# Altium PCB PCB1.pcbdoc
Units mm, origin at the board's own origin, x right, y up, seen from the top; angles counter-clockwise.
Board outline 73.53 x 57.41 mm, 2 copper layers (Top Layer, Bottom Layer); 9 components, 7 nets, 21 pads, 0 vias.
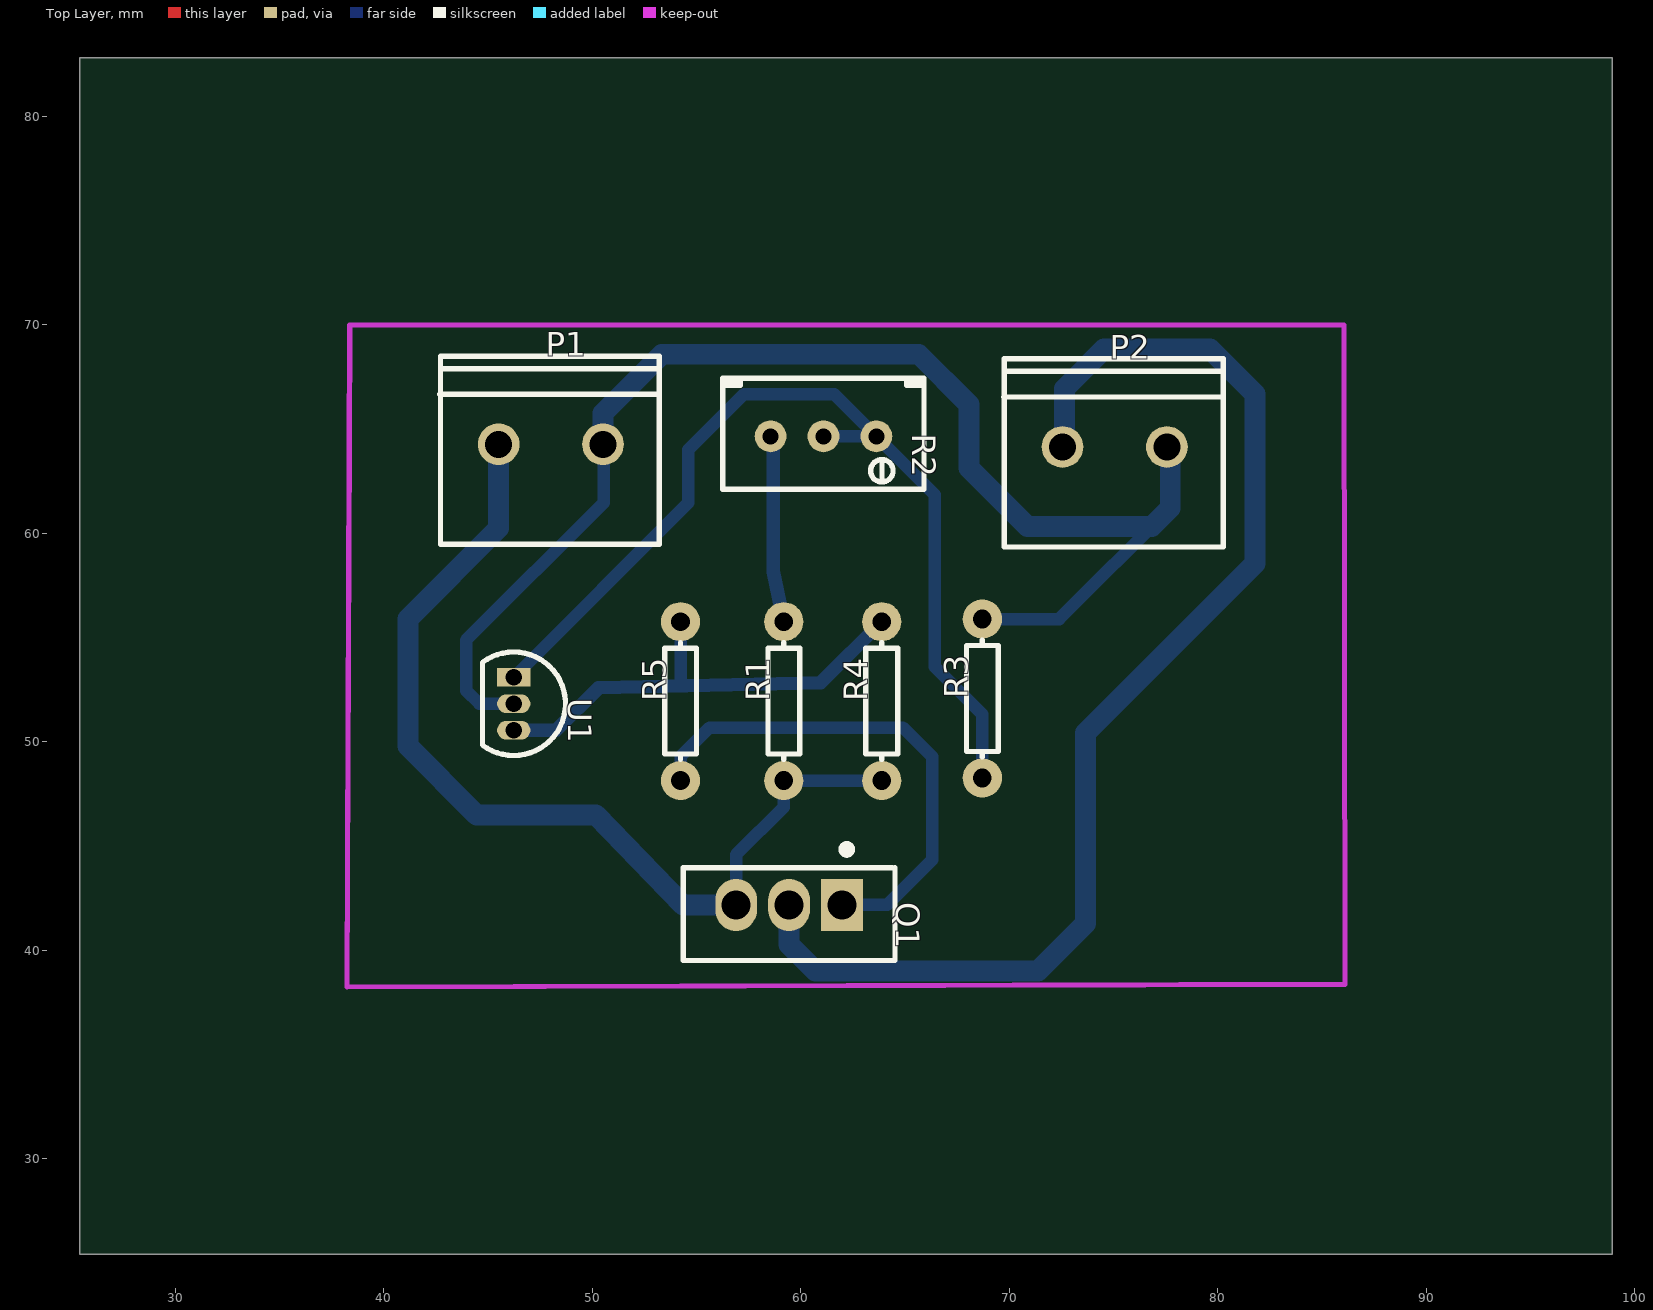
[diagram p0: Top Layer view]
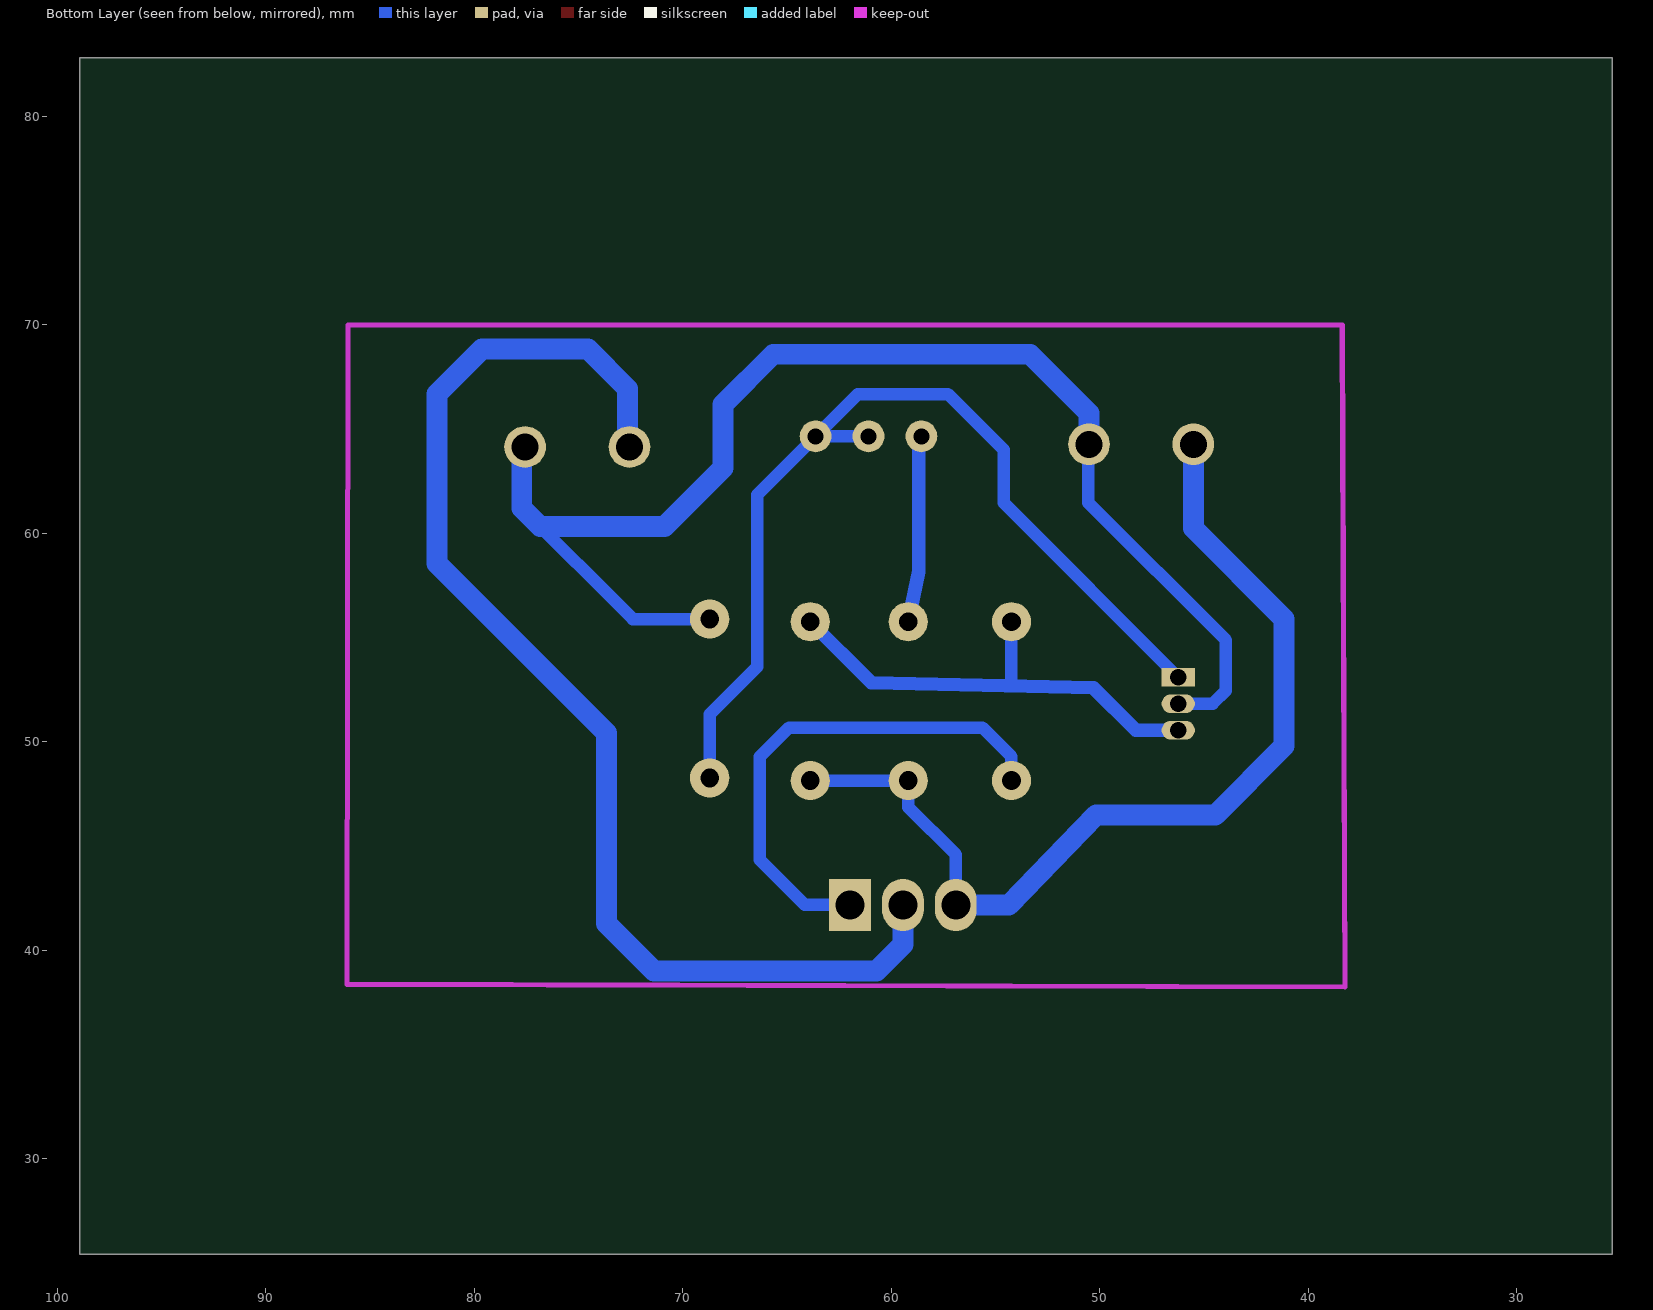
[diagram p1: Bottom Layer view, seen from below]

## Layer stack, top to bottom
Top Layer: signal copper (thickness not stored)
Dielectric: dielectric 0.32, FR-4, Dk 4.8
Bottom Layer: signal copper (thickness not stored)

## Board outline
98.933,25.4 25.4,25.4 25.4,82.814 98.933,82.814

## Components (designator, comment, footprint, x,y, rotation, side; value= is the part's Value field where it differs from the comment)
P1 "CONN-TH_2P-P5.00" CONN-TH_2P-P5.00 48.006,64.262 r0 top
P2 "CONN-TH_2P-P5.00" CONN-TH_2P-P5.00 75.057,64.135 r0 top
Q1 "TIP42C" TO-220-3_L10.0-W4.5-P2.54-T 59.436,42.164 r270 top
R1 "82k" AXIAL-0.3 59.182,51.943 r90 top
R2 "20kΩ" RES-ADJ-TH_3296W 61.087,64.643 r270 top
R3 "20k" AXIAL-0.3 68.707,52.07 r90 top
R4 "1k" AXIAL-0.3 63.881,51.943 r90 top
R5 "1k" AXIAL-0.3 54.229,51.943 r90 top
U1 "TL431CLP" TO-92-3_L4.9-W3.7-P1.27-L 46.228,51.816 r270 top

## Footprints (in the part's own frame and the unit in brackets; to place one, negate y for a bottom-side part, rotate by r counter-clockwise, add the part's x,y. Pads: shape width x height; smd on the part's side, far side on the other; paste and mask are expansions set on the pad)
AXIAL-0.3 [mil]
  round 74 hole 35.4 paste+0 mask+2: 1(-150,0) 2(150,0)
  silkscreen extent -110,-30 110,30
CONN-TH_2P-P5.00 [mm]
  round 2 hole 1.3 paste+0 mask+0.051: 1(-2.504,0) 2(2.504,0)
  silkscreen extent -5.32,-4.8 5.21,4.23
RES-ADJ-TH_3296W [mil]
  round 60 hole 30 paste+0 mask+2: 1(0,100.01) 2(0,0.01) 3(0,-99.99)
  silkscreen extent -110,-190 100,190
TO-92-3_L4.9-W3.7-P1.27-L [mm]
  rect 0.9x1.6 hole 0.8 paste+0 mask+0.051: 1(-1.27,0)
  oval 0.9x1.6 hole 0.8 paste+0 mask+0.051: 2(0,0) 3(1.27,0)
  silkscreen extent -2.48,-1.5 2.48,2.48
TO-220-3_L10.0-W4.5-P2.54-T [mm]
  rect 2.5x2 hole 1.4 paste+0 mask+0.051: 1(0,2.54)
  oval 2.5x2 hole 1.4 paste+0 mask+0.051: 2(0,0) 3(0,-2.54)
  silkscreen extent -2.86,-5.08 2.67,5.08

## Nets (pads, with @x,y where several pads share a name; then routed paths per layer and width w, separated by ;. In a path a pad name is that pad's centre, name@x,y a point inside that pad or via, vN(x,y) a via of type N, cw(c..) or ccw(c..) an arc to the next point about the centre after c; other vN are vias at no path point)
GND: P1.2 P2.2 R3.2 U1.2 | length 69.8
  Bottom Layer w0.6: U1.2 44.577,51.816 43.942,52.451 43.942,54.864 50.546,61.468 50.546,64.226 P1.2 ; R3.2 72.39,55.88 77.724,61.214 77.724,63.972 P2.2
  Bottom Layer w1: P1.2 50.51,65.75 53.34,68.58 65.659,68.58 68.072,66.167 68.072,63.119 70.866,60.325 76.835,60.325 77.724,61.214 77.724,63.972 P2.2
Q1_1: Q1.1 R5.1 | length 24.5
  Bottom Layer w0.6: R5.1 54.229,49.276 55.626,50.673 64.897,50.673 66.294,49.276 66.294,44.323 64.135,42.164 Q1.1
Q1_2: P2.1 Q1.2 | length 60
  Bottom Layer w1: Q1.2 59.436,40.259 60.706,38.989 71.374,38.989 73.66,41.275 73.66,50.419 81.788,58.547 81.788,66.675 79.629,68.834 74.549,68.834 72.644,66.929 72.644,64.226 P2.1
R2_3: R1.2 R2.3 | length 9
  Bottom Layer w0.654: R2.3 58.674,64.516 58.674,58.166 R1.2
U1_1: R2.1 R2.2 R3.1 U1.1 | length 46.4
  Bottom Layer w0.6: U1.1 54.61,61.468 54.61,64.008 57.277,66.675 61.595,66.675 R2.1 ; R2.2 R2.1 ; R3.1 68.707,51.308 66.421,53.594 66.421,61.849 R2.1
U1_3: R4.2 R5.2 U1.3 | length 23.2
  Bottom Layer w0.6: 54.229,52.667 R5.2
  Bottom Layer w0.654: U1.3 48.26,50.546 50.292,52.578 60.96,52.832 R4.2 ; R5.2@53.975,55.499 R5.2
VCC: P1.1 Q1.3 R1.1 R4.1 | length 46.8
  Bottom Layer w0.6: Q1.3 56.896,44.577 59.182,46.863 R1.1 R4.1
  Bottom Layer w1: P1.1 45.502,60.234 41.148,55.88 41.148,49.784 44.45,46.482 50.165,46.482 54.356,42.164 Q1.3